# Altium PCB PCB_Dr5x3.PcbDoc
Units mm, origin at the board's own origin, x right, y up, seen from the top; angles counter-clockwise.
Board outline 75 x 45.98 mm, 2 copper layers (Top Layer, Bottom Layer), stack 1.601 mm thick; 37 components, 22 nets, 122 pads, 7 vias.
Unrouted connection lines stored in the file: 5.
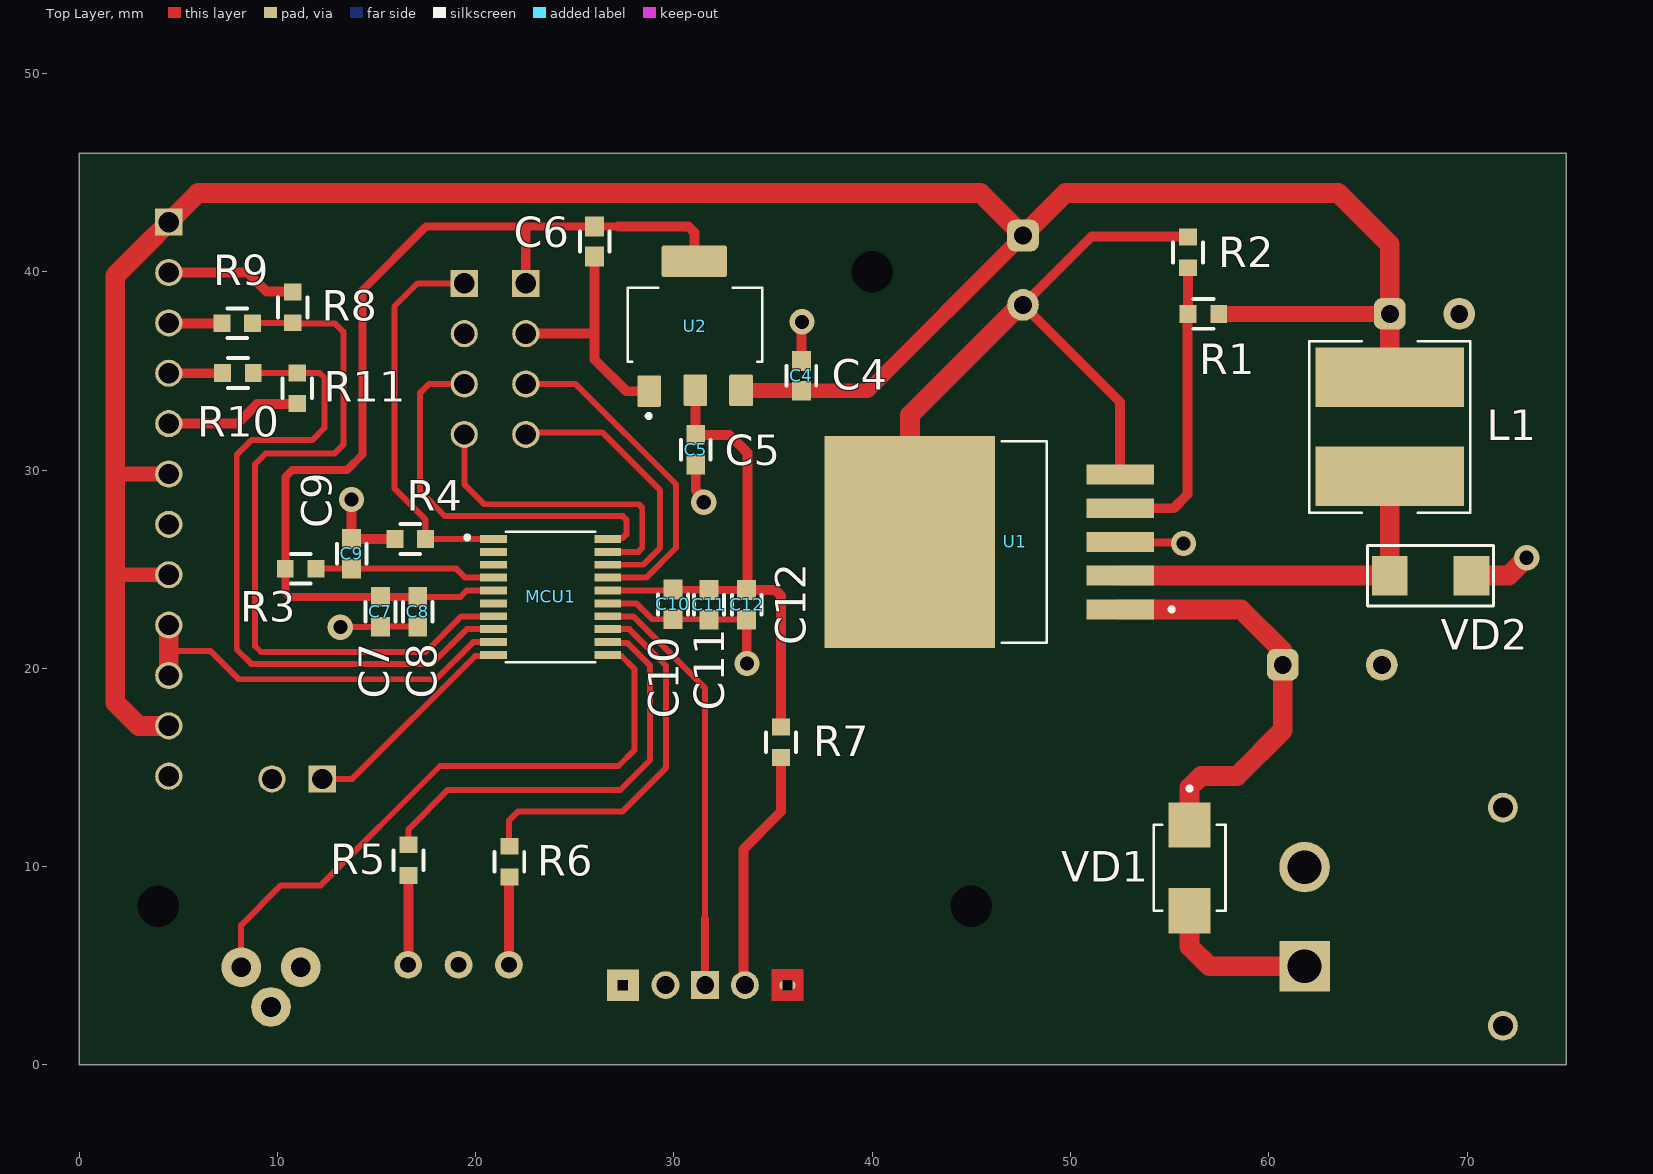
[diagram p0: Top Layer view]
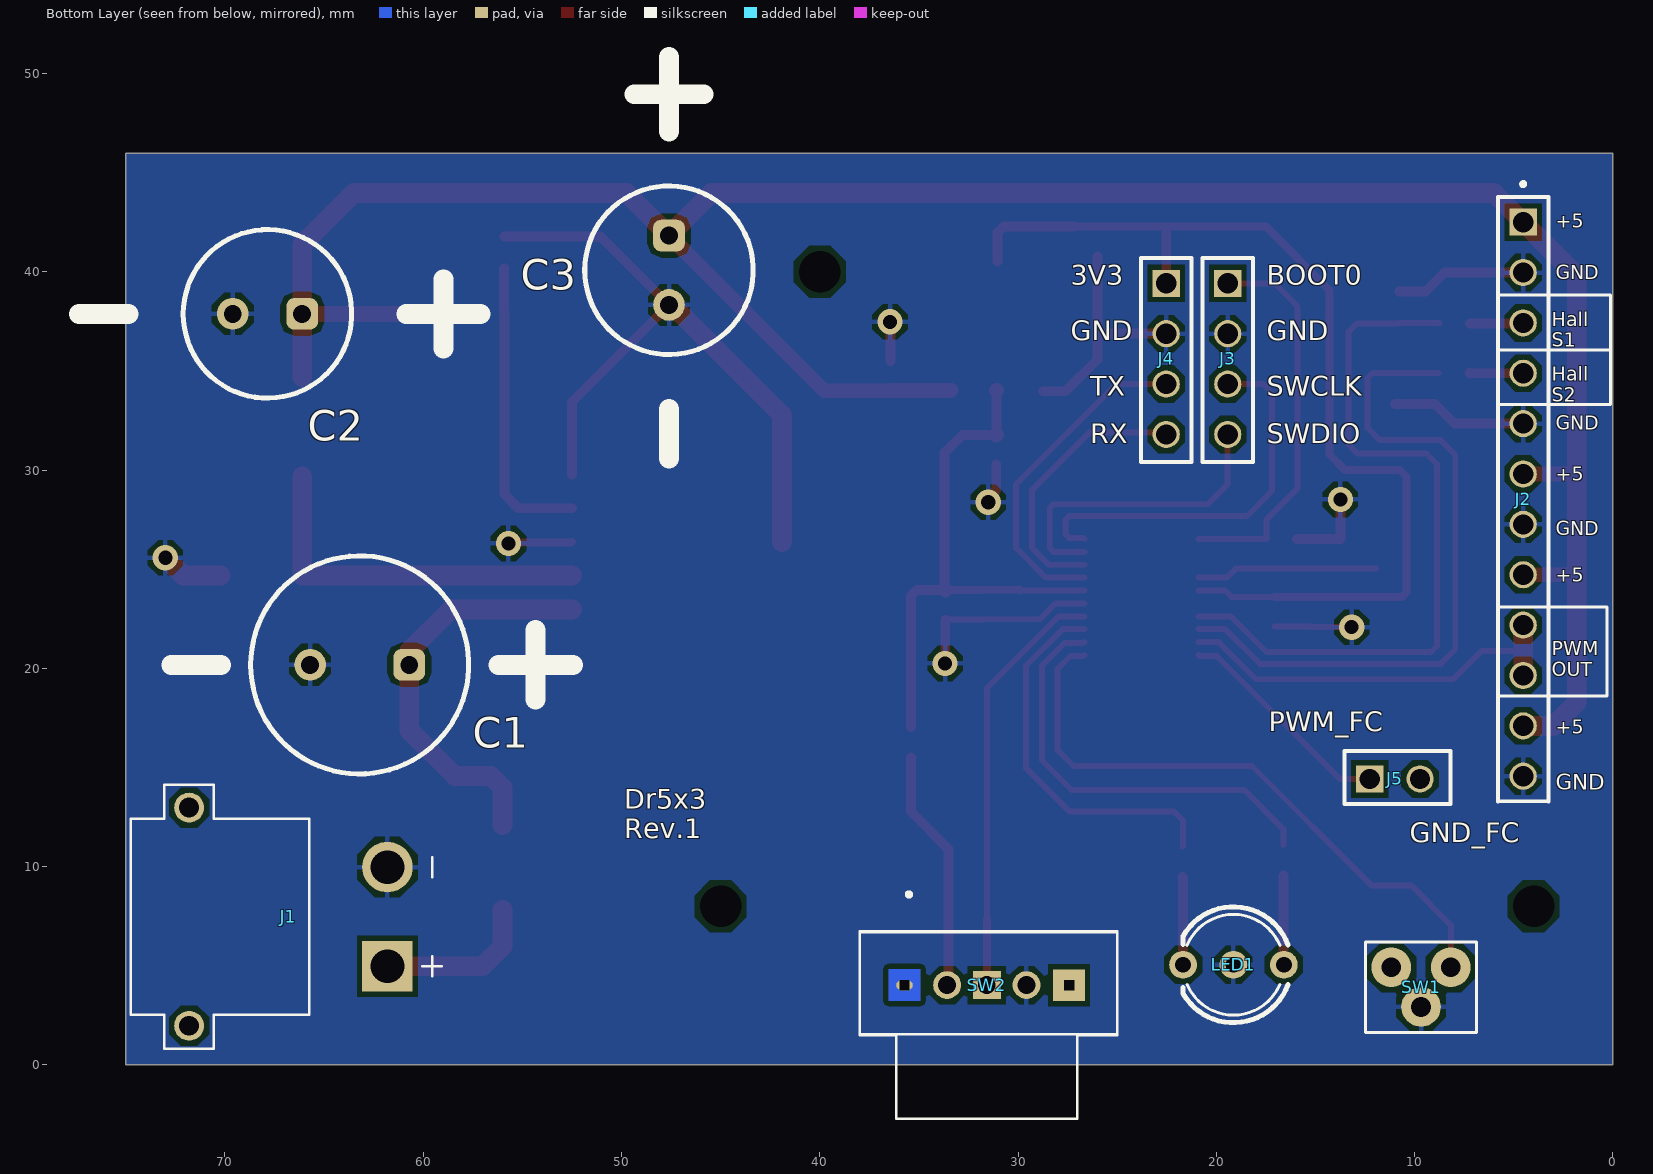
[diagram p1: Bottom Layer view, seen from below]
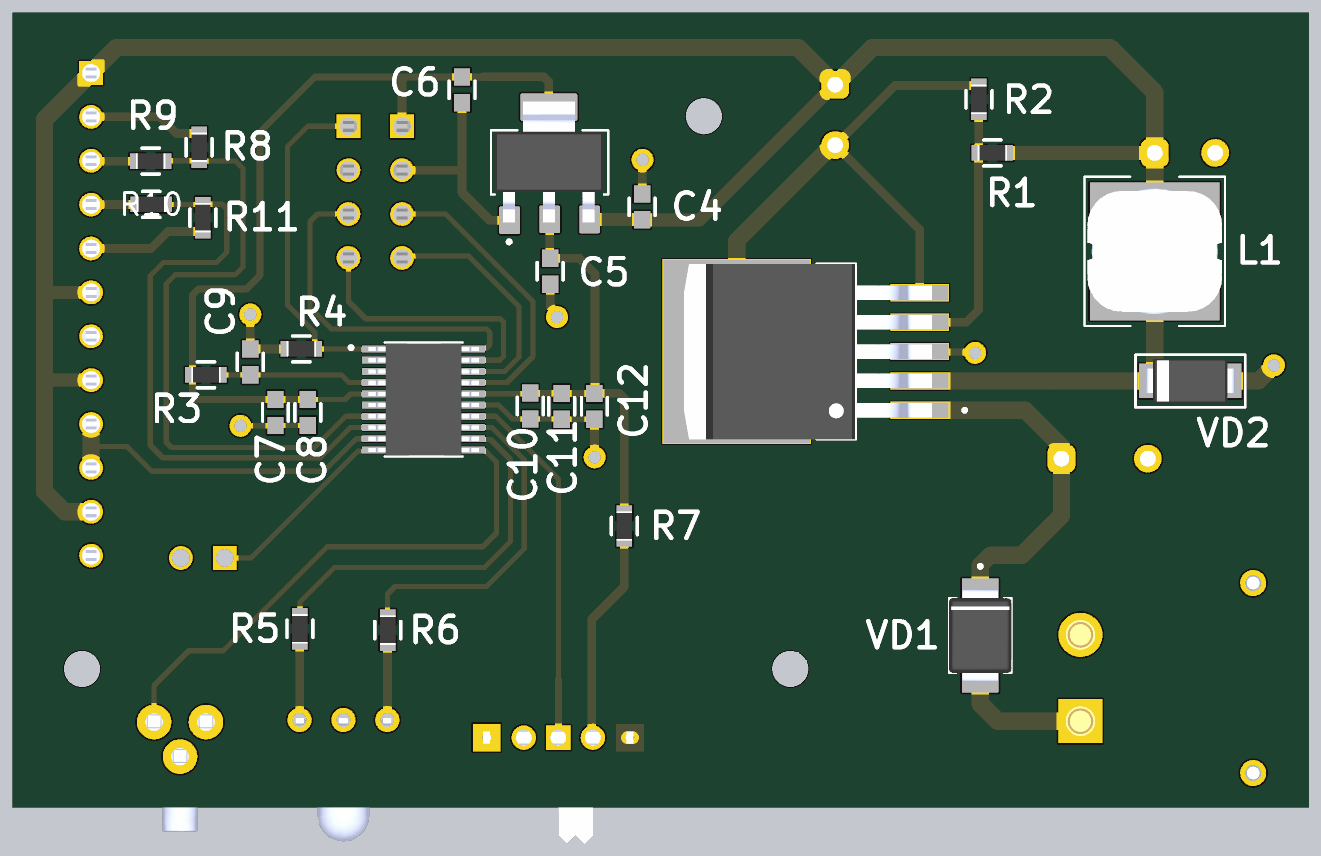
[diagram p2: 3D render of the assembled board from above, using the file's embedded part models]
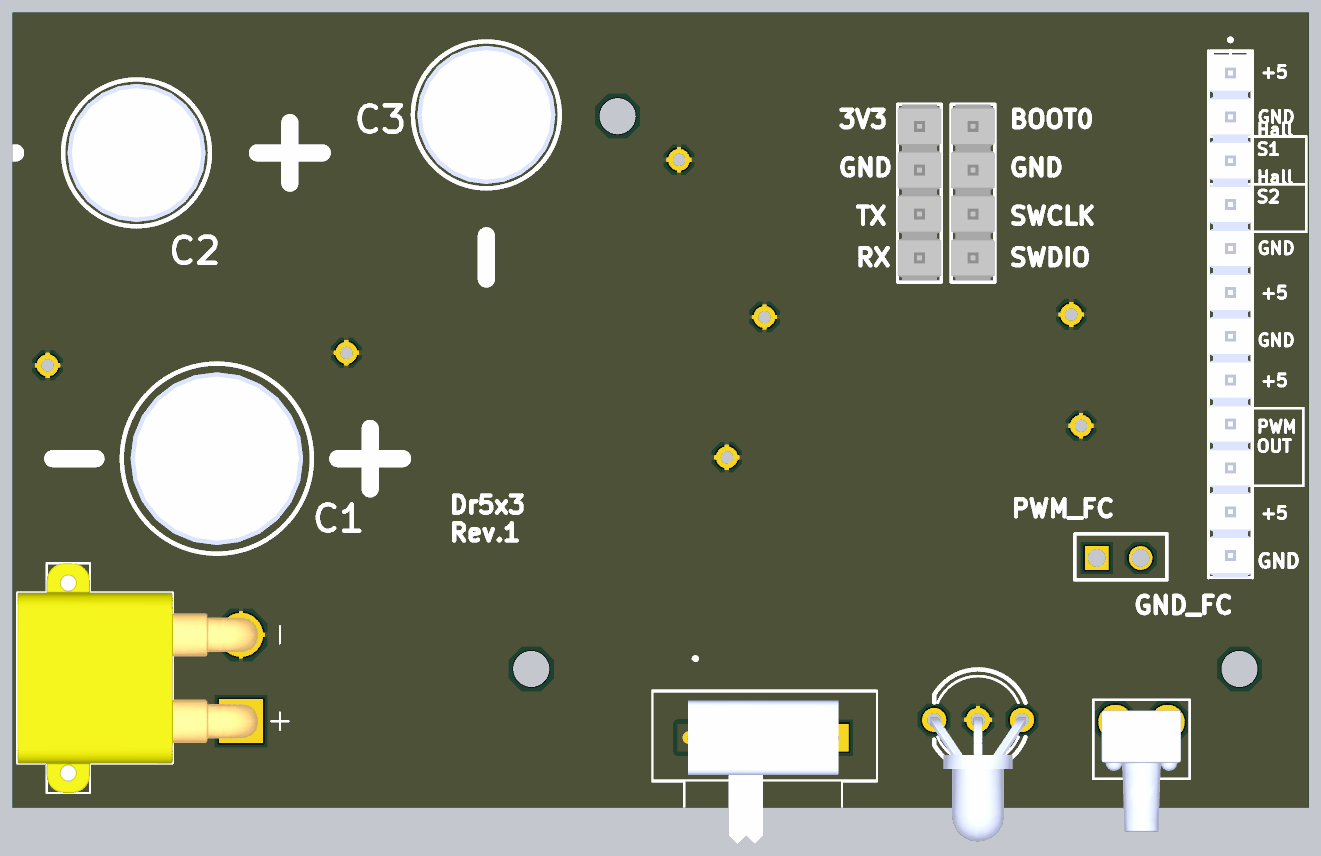
[diagram p3: 3D render of the assembled board from below, using the file's embedded part models]

## Layer stack, top to bottom
Top Solder: solder mask 0.012, Solder Resist, Dk 3.8
Top Layer: signal copper 0.0356
Dielectric 1: dielectric 1.53, FR-4, Dk 4.5
Bottom Layer: signal copper 0.0356
Bottom Solder: solder mask 0.012, Solder Resist, Dk 3.8

## Board outline
0,0 0,45.975 75,45.975 75,0

## Design rules (kind name [scope] priority, off if disabled: settings)
Clearance [All] p1: gap=0.254 ignorepadtopadclearanceinfootprint=TRUE
MinimumSolderMaskSliver [All] p1: minsoldermaskwidth=0.1
PolygonConnect [All] p1: connectstyle=Relief reliefconductorwidth=0.254 reliefentries=4 polygonreliefangle="90 Angle" airgapwidth=0.254
RoutingVias [All] p1: holewidth=1 width=1.6 viastyle="Through Hole" minholewidth=0.711 minwidth=1.27 maxholewidth=0.711 maxwidth=1.27
SilkToSilkClearance [All] p1: silktosilkclearance=0.1
SilkToSolderMaskClearance [IsPad] p1: minsilkscreentomaskgap=0.1 clearancetoexposedcopper=TRUE
SolderMaskExpansion [All] p1: expansion=0.102 istentingtop=FALSE
SupplyNets "Schematic Supply Nets_2" [InNet('GND')] p1: voltage=0.000
SupplyNets "Schematic Supply Nets_1" [InNet('3V3')] p2: voltage=0.000
SupplyNets "Schematic Supply Nets" [InNet('+5')] p3: voltage=0.000
Width [All] p1: maxlimit=1 minlimit=0.2 preferedwidth=0.4 minimp=50.000000 maximp=50.000000 favimp=50.000000
27 further rules are at their usual default settings.

## Classes and differential pairs
component class U_Power: C1 C2 C3 C4 C5 C6 J1 L1 R1 R2 U1 U2 VD1 VD2
component class U_MCU: C7 C8 C9 C10 C11 C12 LED1 MCU1 R3 R4 R5 R6 R7 SW1 SW2
component class U_i_O: J2 J4 J5 R8 R9 R10 R11

## Components (designator, comment, footprint, x,y, rotation, side; value= is the part's Value field where it differs from the comment)
C1 "100uF 63V" C_POL_D10_P5 63.2,20.175 r0 bottom
C2 "220uF 25V" C_POL_D8_P3.5 67.85,37.875 r0 bottom
C3 "1000uF 10V" C_POL_D8_P3.5 47.6,40.075 r270 bottom
C4 "10uF 6,3V" C_0603 36.425,34.75 r90 top
C5 "22uF 6.3V" C_0603 31.1,31.025 r90 top
C6 "22uF 6.3V" C_0603 26,41.525 r90 top
C7 "1nF" C_0603 15.2,22.85 r270 top
C8 "10nF" C_0603 17.075,22.85 r90 top
C9 "100nF" C_0603 13.745,25.775 r270 top
C10 "100nF" C_0603 29.95,23.225 r90 top
C11 "100nF" C_0603 31.765,23.202 r90 top
C12 "4,7uF" C_0603 33.665,23.202 r90 top
J1 "XT30 male" XT30PW-M 71.8,7.475 r90 bottom
J2 "Pin_12_Header" pin_h_12_p2,54mm 4.525,42.5 r270 bottom
J3 "Pin_4_Header" pin_h_4_p2,54mm 19.425,39.415 r270 bottom
J4 "Pin_4_Header" pin_h_4_p2,54mm 22.527,39.415 r270 bottom
J5 "2 pin header" pin_h_2_p2,54mm 12.265,14.425 r180 bottom (schematic designator J3)
L1 "33uH" L_SND0705 66.1,32.175 r90 top
LED1 "Led GB" led_5mm_3pin 19.135,5.05 r90 bottom
MCU1 "STM32F030F4P6" TSSOP-20 23.775,23.6 r0 top
R1 "3.01K" R0603 56.7,37.875 r180 top
R2 "1K" R0603 55.925,40.975 r90 top
R3 "10K" R0603 11.175,25.025 r0 top
R4 "10K" R0603 16.7,26.525 r0 top
R5 "51" R0603 16.616,10.325 r270 top
R6 "51" R0603 21.7,10.25 r270 top
R7 "10K" R0603 35.4,16.275 r90 top
R8 "20K" R0603 10.777,38.2 r270 top
R9 "10K" R0603 7.975,37.4 r180 top
R10 "10K" R0603 8.007,34.894 r180 top
R11 "20K" R0603 11,34.125 r90 top
SW1 "4,5x4,5, H7mm," button_SPST_NO 9.675,3.925 r180 bottom
SW2 "button_slide_switch_2" button_slide_switch_2 31.575,4.025 r180 bottom
U1 "LM2596SX-ADJ/NOPB TI" LM2596SX-ADJ/NOPB 41.9,26.375 r180 top
U2 "AMS1117-3.3" LDO_SOT223 31.1,37.325 r0 top
VD1 "RS2M" VD_DO-214AA 56,9.94 r270 top
VD2 "SS34A" D_SCH_SS34A 68.16,24.675 r180 top

## Footprints (in the part's own frame and the unit in brackets; to place one, negate y for a bottom-side part, rotate by r counter-clockwise, add the part's x,y. Pads: shape width x height; smd on the part's side, far side on the other; paste and mask are expansions set on the pad)
button_slide_switch_2 [mm]
  round 1.408 hole 0.9: 1(-2,0) 3(2,0)
  rect 1.408x1.408 / inner round 1.408 / far side rect 1.408x1.408 hole 0.9: 2(0,0)
  oval 0.825x0.525 hole 0.5 square unplated: N1(-4.15,0)
  rect 1.6x1.6 hole 0.5 square unplated: N2(4.15,0)
  Top Layer region: -4.95,-0.8 -3.35,-0.8 -3.35,0.8 -4.95,0.8
  Bottom Layer region: -4.95,-0.8 -3.35,-0.8 -3.35,0.8 -4.95,0.8
  silkscreen extent -6.41,-6.73 6.59,4.67, body extent -4.35,-6.15 4.35,2.15, height 3.5
button_SPST_NO [mm]
  round 2 hole 1: A(1.5,1) B(0,-1) GND(-1.5,1)
  silkscreen extent -2.79,-2.29 2.79,2.29, body extent -2.3,-5.33 2.3,1.67, height 4.6
C_0603 [mm] "C?"
  rect 1x0.95 smd: 1(-0.75,0) 2(0.75,0)
  silkscreen extent -0.5,-0.75 0.5,0.75, body extent -0.85,-0.45 0.85,0.45, height 0.9
C_POL_D8_P3.5 [mm]
  round 1.6 hole 0.9: N(1.75,0)
  rrect50% 1.6x1.6 hole 0.9 paste-2539.97: P(-1.75,0)
  silkscreen extent -10.75,-4.25 9.5,4.25, body extent -4,-4 4,4, height 11.5
C_POL_D10_P5 [mm]
  round 1.6 hole 0.9: N(2.5,0)
  rrect50% 1.6x1.6 hole 0.9 paste-2539.97: P(-2.5,0)
  silkscreen extent -10.75,-5.5 9.5,5.5, body extent -4.99,-5 4.99,5, height 13
D_SCH_SS34A [mm]
  rect 1.8x2 smd: A(-2.06,0) K(2.06,0)
  silkscreen extent -3.18,-1.52 3.18,1.52, body extent -2.57,-1.28 2.57,1.28, height 2.62
L_SND0705 [mm]
  rect 3x7.5 smd: 1(-2.5,0) 2(2.5,0)
  silkscreen extent -4.32,-4.06 4.32,4.06, body extent -3.65,-3.9 3.65,3.9, height 5
LDO_SOT223 [mm] "AMS1117-3.3"
  rrect15% 1.2x1.6 smd: 1(-2.35,-3.35) 2(-0.025,-3.3) 3(2.286,-3.302)
  rrect15% 3.3x1.6 smd: 4(-0.075,3.2)
  silkscreen extent -3.42,-4.7 3.36,1.86, body extent -3.22,-3.47 3.08,3.53, height 1.8
led_5mm_3pin [mm]
  round 1.4 hole 0.8 mask+0.102: 1(0,2.54) 2(0,0) 3(0,-2.54)
  silkscreen extent -2.92,-2.75 2.92,2.54, body extent -7.04,-2.79 0.13,2.79, height 7
LM2596SX-ADJ/NOPB [mm]
  rect 3.4x1 smd paste-0.05 mask+0.07: 1(-10.6,3.4) 2(-10.6,1.7) 3(-10.6,0) 4(-10.6,-1.7) 5(-10.6,-3.4)
  rect 8.6x10.7 smd paste-0.05 mask+0.07: 3(0,0)
  silkscreen extent -13.3,-5.08 -4.62,5.08, body extent -11.3,-5.08 3.05,5.08, height 4.65
pin_h_2_p2,54mm [mm]
  rect 1.37x1.37 hole 1.02: 1(0,0)
  round 1.37 hole 1.02: 2(2.54,0)
  silkscreen extent -1.27,-1.27 4.06,1.4
pin_h_4_p2,54mm [mm]
  rect 1.37x1.37 hole 1.02: 1(0,0)
  round 1.37 hole 1.02: 2(2.54,0) 3(5.08,0) 4(7.62,0)
  silkscreen extent -1.27,-1.27 9.02,1.27, body extent -1.27,-1.27 8.89,1.27, height 8.38
pin_h_12_p2,54mm [mm]
  rect 1.37x1.37 hole 1.02: 1(0,0)
  round 1.37 hole 1.02: 2(2.54,0) 3(5.08,0) 4(7.62,0) 5(10.16,0) 6(12.7,0) 7(15.24,0) 8(17.78,0) 9(20.32,0) 10(22.86,0) 11(25.4,0) 12(27.94,0)
  silkscreen extent -2.02,-1.27 29.21,1.27, body extent -1.4,-1.27 29.21,1.27, height 5.21
R0603 [mm]
  rect 0.85x0.9 smd: 1(-0.775,0) 2(0.775,0)
  silkscreen extent -0.5,-0.75 0.5,0.75, body extent -0.85,-0.45 0.85,0.45, height 0.55
TSSOP-20 [mm]
  rect 1.35x0.4 smd mask+0.05: 1(-2.88,2.925) 2(-2.88,2.275) 3(-2.88,1.625) 4(-2.88,0.975) 5(-2.88,0.325) 6(-2.88,-0.325) 7(-2.88,-0.975) 8(-2.88,-1.625) 9(-2.88,-2.275) 10(-2.88,-2.925) 11(2.88,-2.925) 12(2.88,-2.275) 13(2.88,-1.625) 14(2.88,-0.975) 15(2.88,-0.325) 16(2.88,0.325) 17(2.88,0.975) 18(2.88,1.625) 19(2.88,2.275) 20(2.88,2.925)
  silkscreen extent -4.3,-3.3 2.25,3.3, body extent -3.2,-3.25 3.2,3.25, height 1.16
VD_DO-214AA [mm]
  rect 2.28x2.12 smd: A(2.165,0) C(-2.165,0)
  silkscreen extent -4.1,-1.81 2.16,1.81, body extent -2.68,-1.81 2.68,1.81, height 2.65
XT30PW-M [mm]
  round 2.55 hole 1.7: N(2.5,-10)
  rect 2.55x2.55 / inner round 2.55 / far side rect 2.55x2.55 hole 1.7: P(-2.5,-10)
  round 1.508 hole 1: S1(5.5,0) S2(-5.5,0)
  silkscreen extent -6.65,-12.75 6.65,2.95, body extent -6.65,-11 6.65,2.95, height 5

## Part data
C1: library part "100uF 63V EHR 10x13mm", "100uF 63V EHR 10x13mm (EHR101M63B-Hitano)  Electrolytic", Capacitance=100uF, MPN=EHR101M63B-Hitano, Package="RADIAL-2 Panasonic", Supplier Part Number 1=50458, Voltage=63V, Availability="In Stock", Category=Electrolytic, Check_prices=https://www.snapeda.com/parts/EEUFR1J101LB/Panasonic/view-part/?ref=eda, Component Link 1 Description=Datasheet, Component Link 1 URL=https://www.rcscomponents.kiev.ua/datasheets/EHR_081225.pdf, MF=Hitano, MP=EEUFR1J101LB, Part Number="100uF 63V EHR 10x13mm", Price=None, SnapEDA_Link=https://www.snapeda.com/parts/EEUFR1J101LB/Panasonic/view-part/?ref=snap, Supplier 1=rcscomponents, Supplier Link 1=https://www.rcscomponents.kiev.ua/product/100uf-63v-ehr-10x13mm-ehr101m63b-hitano-elektrolitychnyi-kondensator_50458.html
C2: library part "220uF 25V RTE 8x11,5mm (low esr)", "220uF 25V RTE 8x11,5mm (low esr) (RTE1E221M0812-LEAGUER) Electrolytic", Capacitance=220uF, MPN=RTE1E221M0812-LEAGUER, Package="RADIAL-2 Panasonic", Supplier Part Number 1=180534, Voltage=25V, Availability="In Stock", Category=Electrolytic, Check_prices=https://www.snapeda.com/parts/EEUFR1J101LB/Panasonic/view-part/?ref=eda, Component Link 1 Description=Datasheet, Component Link 1 URL=https://www.rcscomponents.kiev.ua/datasheets/leaguer-rte_series-datasheet.pdf, ESR=low, MF=LEAGUER, MP=EEUFR1J101LB, Part Number="220uF 25V RTE 8x11,5mm (low esr)", Price=None, SnapEDA_Link=https://www.snapeda.com/parts/EEUFR1J101LB/Panasonic/view-part/?ref=snap, Supplier 1=rcscomponents, Supplier Link 1=https://www.rcscomponents.kiev.ua/product/220uf-25v-rte-8x11-5mm-low-esr-rte1e221m0812-leaguer-elektrolitychnyi-kondensator-nyzkoimpedansnyi_180534.html
C3: library part "1000uF 10V RT1 8x12mm", "1000uF 10V RT1 8x12mm +105°С", Capacitance=1000uF, Dielectric=electrolit, MPN=RT11A102M0812, Package="RADIAL-2 Panasonic", Supplier Part Number 1=124893, Voltage=10V, Availability="In Stock", Category="Pol electrolit", Check_prices=https://www.snapeda.com/parts/EEUFR1J101LB/Panasonic/view-part/?ref=eda, Component Link 1 Description=Datasheet, Component Link 1 URL=https://www.rcscomponents.kiev.ua/datasheets/ke47003518x36t-datasheet.pdf, MF=Leaguer, MP=EEUFR1J101LB, Part Number="1000uF 10V RT1 8x12mm", Price=None, SnapEDA_Link=https://www.snapeda.com/parts/EEUFR1J101LB/Panasonic/view-part/?ref=snap, Supplier 1=rcscomponents, Supplier Link 1=https://www.rcscomponents.kiev.ua/product/1000uf-10v-rt1-8x12mm-rt11a102m0812-leaguer-elektrolitychnyi-kondensator_124893.html
C4: library part "10uF 6,3V X5R 20% 0603", "10uF 6,3V X5R 20% 0603", Capacitance=10uF, Dielectric=X5R, MPN=C0603X106M063NT, Supplier Part Number 1=50744, Tolerance=0.2, Voltage=6.3V, Category="Ceramic Capacitor", Component Link 1 Description=Datasheet, Component Link 1 URL=https://www.rcscomponents.kiev.ua/datasheets/X7R_X5R.pdf, MF=Hitano, Part Number="10uF 6,3V X5R 20% 0603", Supplier 1=rcscomponents, Supplier Link 1=https://www.rcscomponents.kiev.ua/product/10uf-6-3v-x5r-20-0603-4k-reel-c0603x106m063nt-hitano-kondensator-keramichnyi-smd_50744.html
C5 C6: library part "22uF 6,3V X5R 20% 0603", "22uF 6,3V X5R 20% 0603", Capacitance=22uF, Dielectric=X5R, MPN=CL10A226MQ8NRNC, Supplier Part Number 1=128028, Tolerance=0.2, Voltage=6.3V, Category="Ceramic Capacitor", Component Link 1 Description=Datasheet, Component Link 1 URL=https://www.rcscomponents.kiev.ua/datasheets/cl_series_mlcc_datasheet.pdf, MF=Samsung, Part Number="22uF 6,3V X5R 20% 0603", Supplier 1=rcscomponents, Supplier Link 1=https://www.rcscomponents.kiev.ua/product/22uf-6-3v-x5r-20-0603-cl10a226mq8nrnc-samsung_128028.html
C7: library part "1nF 50V X7R 5% 0603", "1nF 50V X7R 5% 0603 4k/reel (C0603B102J500NT-Hitano)", Dielectric=X7R, MPN=C0603B102J500NT, Supplier Part Number 1=3303, Tolerance=0.05, Voltage=50V, Capacitance=1nF, Category="Ceramic Capacitor", Component Link 1 Description=Datasheet, Component Link 1 URL=https://www.rcscomponents.kiev.ua/datasheets/X7R_X5R.pdf, MF=Hitano, Part Number="1nF 50V X7R 5% 0603", Supplier 1=rcscomponents, Supplier Link 1=https://www.rcscomponents.kiev.ua/product/1nf-50v-x7r-5-0603-4k-reel-c0603b102j500nt-hitano-kondensator-keramichnyi-smd_3303.html
C8: library part "10nF 50V X7R 10% 0603", "10nF 50V X7R 10% 0603 (CL10B103KB8NNNC-Samsung)", Dielectric=X7R, MPN=CL10B103KB8NNNC, Supplier Part Number 1=34908, Tolerance=0.1, Voltage=50V, Capacitance=10nF, Category="Ceramic Capacitor", Component Link 1 Description=Datasheet, Component Link 1 URL=https://www.rcscomponents.kiev.ua/datasheets/cl_series_mlcc_datasheet.pdf, MF=Samsung, Part Number="10nF 50V X7R 10% 0603", Supplier 1=rcscomponents, Supplier Link 1=https://www.rcscomponents.kiev.ua/product/10nf-50v-x7r-10-0603-cl10b103kb8nnnc-samsung-kondensator-keramichnyi-smd_34908.html
C9 C10 C11: library part "100nF 16V X7R 5% 0603", "100nF 16V X7R 5% 0603 (CL10B104JO8NNNC – Samsung)", Dielectric=X7R, MPN=CL10B104JO8NNNC, Supplier Part Number 1=153351, Tolerance=0.05, Voltage=16V, Capacitance=100nF, Category="Ceramic Capacitor", Component Link 1 Description=Datasheet, Component Link 1 URL=https://www.rcscomponents.kiev.ua/datasheets/cl_series_mlcc_datasheet.pdf, MF=Samsung, Part Number="100nF 16V X7R 5% 0603", Supplier 1=rcscomponents, Supplier Link 1=https://www.rcscomponents.kiev.ua/product/100nf-16v-x7r-5-0603-cl10b104jo8nnnc-samsung_153351.html
C12: library part "4,7uF 6,3V X5R 10% 0603", "4,7uF 6,3V X5R 10% 0603 (CL10A475KQ8NNNC-Samsung)", Dielectric=X5R, MPN=CL10A475KQ8NNNC, Supplier Part Number 1=50674, Tolerance=0.1, Voltage=6.3V, Capacitance=4,7uF, Category="Ceramic Capacitor", Component Link 1 Description=Datasheet, Component Link 1 URL=https://www.rcscomponents.kiev.ua/datasheets/cl_series_mlcc_datasheet.pdf, MF=Samsung, Part Number="4,7uF 6,3V X5R 10% 0603", Supplier 1=rcscomponents, Supplier Link 1=https://www.rcscomponents.kiev.ua/product/4-7uf-6-3v-x5r-10-0603-cl10a475kq8nnnc-samsung_50674.html
J1: library part XT30PW-M, "Socket; DC supply; XT30; male; PIN: 2; on PCBs; THT; Colour: yellow", Package=None, Supplier Part Number 1=395565, Check_prices=https://www.snapeda.com/parts/XT30PW-M/AMASS/view-part/?ref=eda, MF=AMASS, MP=XT30PW-M, MPN=XT30PW-M, Part Number=XT30PW-M, SnapEDA_Link=https://www.snapeda.com/parts/XT30PW-M/AMASS/view-part/?ref=snap, Supplier 1=IMRAD, Supplier Link 1=https://imrad.com.ua/ru/xt30pw-m
J5: "p.2,54mm", Supplier Part Number 1=SKV114, MPN="2 pin header", Part Number="2 pin header", Supplier 1="Arduino UA", Supplier Link 1=https://arduino.ua/ru/prod332-konnektor-40-pin-papa
L1: library part "33uH, ±20%, 1.2A, 0.13 Ohm", "SND0705-330M (33uH, ±20%, 1.2A, 0.13 Ohm, SMD: 7.8x7.0mm, h=5.0mm) Anla Tech", Current=1.2A, Inductance="33 µH", MPN=SND0705-330M, Package=None, Supplier Part Number 1=39225, Tolerance=±20%, Availability="In Stock", Category="Power Inductor", Check_prices=https://www.snapeda.com/parts/B82472P6472M000/TDK/view-part/?ref=eda, Component Link 1 Description=Datasheet, Component Link 1 URL=https://www.rcscomponents.kiev.ua/datasheets/SND-1.pdf, DCR="0.13 Ω", MF=AnlaTech/IH, MP=B82472P6472M000, Part Number="33uH, ±20%, 1.2A, 0.13 Ohm", Price=None, Purchase-URL=https://pricing.snapeda.com/search/part/B82472P6472M000/?ref=eda, SnapEDA_Link=https://www.snapeda.com/parts/B82472P6472M000/TDK/view-part/?ref=snap, Supplier 1=rcscomponents, Supplier Link 1=https://www.rcscomponents.kiev.ua/product/snd0705-330m-33uh-20-1-2a-0-13-ohm-smd-7-8x7-0mm-h-5-0mm-anla-tech-drosel-sylovyi_39225.html
LED1: library part NPN328, "Led 5mm Green Blue СС", Package="Radial Vishay", Availability=Unavailable, Category=Led, IF=0.020A, MF=Vishay, MP=TLUV5300, MPN=NPN328, Part Number=NPN328, Price=None, SnapEDA_Link=https://www.snapeda.com/parts/TLUV5300/Vishay%20Semiconductor%20Opto%20Division/view-part/233523/?ref=snap, Supplier 1=Arduino.ua, Supplier Link 1=https://arduino.ua/ru/prod6409-svitlodiod-dvokolirnii-prozorii-3mm-katod-sinii-zelenii, Supplier Part Number 1=NPN328, VRRM=3-3.2V
MCU1: library part TSSOP-20, "MCU", CPU Frequency="48 MHz", Operating Voltage="2.4–3.6 V", Supplier Part Number 1=68666, ADC=12-bit, Check_prices=https://www.snapeda.com/parts/STM32F030F4P6/STMicroelectronics/view-part/?ref=eda, Component Link 1 Description=Datasheet, Component Link 1 URL=https://www.rcscomponents.kiev.ua/datasheets/dm00088500-datasheet.pdf, Core="ARM Cortex-M0", Flash="16 KB", GPIO=15, MF=STMicroelectronics, MP=STM32F030F4P6, MPN=STM32F030F4P6, Package=TSSOP-20, Part Number=TSSOP-20, RAM="4 KB", SnapEDA_Link=https://www.snapeda.com/parts/STM32F030F4P6/STMicroelectronics/view-part/?ref=snap, Supplier 1=rcscomponents, Supplier Link 1=https://www.rcscomponents.kiev.ua/product/stm32f030f4p6_68666.html
R1: library part "R0603 3.01K 1% 0.1W", "R0603 3.01K 1% 0.1W Hitano", MPN=RC0603FR-3K01R, Power=0.1W, Supplier Part Number 1=27651, Tolerance=0.01, Voltage=50V, Category="Thick Film Resistor", Component Link 1 Description=Datasheet, Component Link 1 URL=https://www.rcscomponents.kiev.ua/datasheets/RC0603HIT.pdf, MF=Hitano, Part Number="R0603 3.01K 1% 0.1W", Resistance=3.01K, Supplier 1=rcscomponents, Supplier Link 1=https://www.rcscomponents.kiev.ua/product/3-01-kohm-1-0-1w-50v-0603-rc0603fr-3k01r-hitano-rezystor-smd_27651.html, TCR="±100 ppm/°C"
R2: library part "R0603 1K 1% 0.1W", "R0603 1K 1% 0.1W YAGEO", MPN=RC0603FR-071KL, Power=1/10W, Resistance=1k, Supplier Part Number 1=182684, Tolerance=0.01, Voltage=75V, Category="Thick Film Resistor", Component Link 1 Description=Datasheet, Component Link 1 URL=https://www.rcscomponents.kiev.ua/datasheets/rc0603-272842.pdf, MF=YAGEO, Part Number="R0603 1K 1% 0.1W", Supplier 1=rcscomponents, Supplier Link 1=https://www.rcscomponents.kiev.ua/product/1-kohm-1-0-1w-75v-0603-rc0603fr-071kl-yageo-rezystor-smd_182684.html, TCR="±100 ppm/°C"
R3 R4 R7 R9 R10: library part "R0603 10K 5% 0.1W", "10 kOhm 5% 0,1W 50V", MPN=RC0603JR-0710KL, Power=0.1W, Supplier Part Number 1=107096, Tolerance=0.05, Voltage=50V, Category="Thick Film Resistor", Component Link 1 Description=Datasheet, MF=Yageo, Part Number="R0603 10K 5% 0.1W", Resistance=10K, Supplier 1=rcscomponents, Supplier Link 1=https://www.rcscomponents.kiev.ua/product/10-kohm-5-0-1w-50v-0603-rc0603jr-0710kl-yageo_107096.html
R5 R6: library part "51 Ohm 5% 0,1W 50V 0603", "51 Ohm 5% 0,1W 50V 0603", MPN=RC0603JR-51R, Power=0.1W, Resistance="51 Ohm", Supplier Part Number 1=4627, Tolerance=0.05, Voltage=50V, Category="Thick Film Resistor", Component Link 1 Description=Datasheet, Component Link 1 URL=https://www.rcscomponents.kiev.ua/datasheets/rc_series_hitano-datasheet.pdf, MF=Hitano, Part Number="51 Ohm 5% 0,1W 50V 0603", Supplier 1=rcscomponents, Supplier Link 1=https://www.rcscomponents.kiev.ua/product/51-ohm-5-0-1w-50v-0603-rc0603jr-51r-hitano-rezystor-smd_4627.html
R8 R11: library part "R0603 20 kOhm 1% 0,1W 50V", "20 kOhm 1% 0,1W 50V", MPN=RC0603FR-20KR, Power=0.1W, Supplier Part Number 1=16748, Tolerance=0.01, Voltage=50V, Category="Thick Film Resistor", Component Link 1 Description=Datasheet, Component Link 1 URL=https://www.rcscomponents.kiev.ua/datasheets/rc_series_hitano-datasheet.pdf, MF=Hitano, Part Number="R0603 20 kOhm 1% 0,1W 50V", Resistance=20K, Supplier 1=rcscomponents, Supplier Link 1=https://www.rcscomponents.kiev.ua/product/20-kohm-1-0-1w-50v-0603-rc0603fr-20kr-hitano-rezystor-smd_16748.html
SW1: library part SPST-NO, MPN=KFC-045P3-7.0, Param 1 (Value)=0,98N., Param 2 (Power)="4,5x4,5, H7mm", Param 3 (Tolerance)=12VDC/50mA, Supplier Part Number 1=209769, MF=Daier, Param 4 (Category)="Tact button corner THT", Part Number=SPST-NO, Supplier 1=rcscomponents., Supplier Link 1=https://www.rcscomponents.kiev.ua/product/knopka-taktova-kutova-4-5x4-5-h7mm-kfc-045p3-7-0_209769.html
SW2: "8x6,9x4,3", MPN="SK-12D11-VG3 KLS", Package=None, Supplier Part Number 1=148265, Check_prices=https://www.snapeda.com/parts/STS121RA04/TE+Connectivity+ALCOSWITCH+Switches/view-part/?ref=eda, Component Link 1 Description=Datasheet, Component Link 1 URL=https://www.rcscomponents.kiev.ua/datasheets/sk-12d11-vg3.pdf, MF="TE Connectivity", MP=STS121RA04, Part Number=button_slide_switch_2, SnapEDA_Link=https://www.snapeda.com/parts/STS121RA04/TE+Connectivity+ALCOSWITCH+Switches/view-part/?ref=snap, Supplier 1=rcscomponents148265, Supplier Link 1=https://www.rcscomponents.kiev.ua/product/peremykach-rushiinyi-sk-12d11-vg3_148265.html
U1: library part LM2596SX-ADJ/NOPB, "DC/DC Buck Converter IC", Frequency="150 kHz", Package="TO-263-5 Texas Instruments", Supplier Part Number 1=61180, Category="Buck Converter (SMD)", Check_prices=https://www.snapeda.com/parts/LM2596SX-ADJ/NOPB/Texas+Instruments/view-part/?ref=eda, Component Link 1 Description=Datasheet, Component Link 1 URL=https://www.ti.com/general/docs/suppproductinfo.tsp?distId=10&gotoUrl=http%3A%2F%2Fwww.ti.com%2Flit%2Fgpn%2Flm2596, IOUT=3A, MF="Texas Instruments", MP=LM2596SX-ADJ/NOPB, MPN=LM2596SX-ADJ/NOPB, Part Number=LM2596SX-ADJ/NOPB, SnapEDA_Link=https://www.snapeda.com/parts/LM2596SX-ADJ/NOPB/Texas+Instruments/view-part/?ref=snap, Supplier 1=rcscomponents, Supplier Link 1=https://www.rcscomponents.kiev.ua/product/lm2596sx-adj-nopb_61180.html, Type=Adjustable, VIN=4.5–40V, VOUT="1.23–37 V, Adjustable"
U2: library part LDO_SOT223_3V3, "Linear Voltage Regulator IC Positive Fixed 1 Output 1A SOT-223-3L", Package="SOT-223-3L UMW", Supplier Part Number 1=87031, Category="LDO Regulator (SMD)", Check_prices=https://www.snapeda.com/parts/AMS1117-3.3/UMW/view-part/?ref=eda, Component Link 1 Description=Datasheet, Component Link 1 URL=https://mm.digikey.com/Volume0/opasdata/d220001/medias/docus/7158/5272_AMS1117-3.3.pdf, Dropout=1.1V, IOUT=1A, MF=Multiple, MP=AMS1117-3.3, MPN=AMS1117-3.3, Output Type=Fixed, Part Number=LDO_SOT223_3V3, SnapEDA_Link=https://www.snapeda.com/parts/AMS1117-3.3/UMW/view-part/?ref=snap, Supplier 1=rcscomponents, Supplier Link 1=https://www.rcscomponents.kiev.ua/product/ams1117-3-3_87031.html, VIN (Max)=15V, VOUT=3.3V
VD1: library part "RS2M MIC", "Vf 1.3 / I2A / 1000V", Package="DO-214AA-2 Taiwan Semiconductor", Supplier Part Number 1=182600, Availability="In Stock", Category=Diode, Check_prices=https://www.snapeda.com/parts/RS2M/Taiwan+Semiconductor/view-part/?ref=eda, Component Link 1 Description=Datasheet, Component Link 1 URL=https://www.rcscomponents.kiev.ua/product/rs2m_182600.html, IF=2A, MF=MIC, MP=RS2M, MPN="RS2M MIC", Part Number="RS2M MIC", Price=None, SnapEDA_Link=https://www.snapeda.com/parts/RS2M/Taiwan+Semiconductor/view-part/?ref=snap, Supplier 1=rcscomponents, Supplier Link 1=https://www.rcscomponents.kiev.ua/product/rs2m_182600.html, VF=1.3V, VRRM=1000V
VD2: "Vrrm 40V / If 3А / Vf0,5V / Ifsm80A", Supplier Part Number 1=199953, Category="Schottky Diode", Component Link 1 Description=Datasheet, Component Link 1 URL=https://www.rcscomponents.kiev.ua/datasheets/2204281430_Guangdong-Hottech-SS34A_C2886580.pdf, IF=3A, IFSM=80A, MF=Hottech, MPN=SS34A, Part Number=SS34A, Supplier 1=rcscomponents, Supplier Link 1=https://www.rcscomponents.kiev.ua/product/ss34a_199953.html, VF=0.5V, VRRM=40V

## Free pads (board coordinates)
  round 2 hole 2.1 unplated: ""(4,8) ""(40,40) ""(45,8)

## Via types
v1: diameter 1.27, hole 0.711, Top Layer to Bottom Layer, 7 vias

## Nets (pads, with @x,y where several pads share a name; then routed paths per layer and width w, separated by ;. In a path a pad name is that pad's centre, name@x,y a point inside that pad or via, vN(x,y) a via of type N, cw(c..) or ccw(c..) an arc to the next point about the centre after c; other vN are vias at no path point)
3V3: C5.2 C6.2 C7.1 C8.2 C10.2 C11.2 C12.2 J4.1 MCU1.5 MCU1.16 R3.1 R7.2 U2.2 U2.4 | length 79.2
  Top Layer w0.3: C8.2 19.225,23.6 19.55,23.925 MCU1.5 ; MCU1.16@26.655,23.93 C10.2@29.905,23.93
  Top Layer w0.4: C8.2 C7.1 10.634,23.6 10.4,23.834 R3.1 10.4,29.65 10.75,30 13.51,30 14.3,30.79 14.3,39.075 17.5,42.275 22.375,42.275 C6.2 27.2,42.275 ; C10.2@29.905,23.93 C10.2 29.961,23.964 31.754,23.964 C11.2 C12.2
  Top Layer w0.5: J4.1 22.527,42.137 ; 27.2,42.275 30.725,42.275 31.025,41.975 U2.4 ; C5.2@31.087,31.788 U2.2@31.087,34.012 ; C5.2 32.8,31.775 33.7,30.875 C12.2@33.7,23.987 ; C12.2 35.107,23.952 35.4,23.659 R7.2
  Top Layer w0.75: U2.2 U2.2@31.087,34.012 ; C5.2@31.087,31.788 C5.2 ; C12.2 C12.2@33.7,23.987
+5: C2.P C3.P C4.1 J2.1 J2.6 J2.8 J2.11 L1.2 R1.1 U2.3 | length 131.7
  Top Layer w0.75: 1.825,24.72 J2.8 ; 1.825,29.8 J2.6 ; U2.3 33.397,34.011 36.414,34.011 C4.1 39.775,34 C3.P
  Top Layer w0.8: R1.1@57.552,37.875 C2.P
  Top Layer w1: J2.11 3.005,17.1 1.825,18.28 1.825,24.72 1.825,29.8 1.825,39.8 6,43.975 45.45,43.975 C3.P 49.75,43.975 63.5,43.975 66.1,41.375 C2.P L1.2
BOOT0: J3.1 MCU1.1 R4.2 | length 19.8
  Top Layer w0.3: J3.1 17.065,39.415 15.9,38.25 15.9,29.075 17.475,27.5 R4.2 MCU1.1
FB: R1.2 R2.1 U1.4 | length 15.1
  Top Layer w0.5: U1.4 55.2,28.075 55.9,28.775 55.9,37.973 55.902,37.975 55.913,37.987 55.913,40.165 R2.1@55.902,40.177
GND: C1.N C2.N C3.N C4.2 C5.1 C6.1 C7.2 C8.1 C9.1 C10.1 C11.1 C12.1 J1.N J2.2 J2.5 J2.7 J2.12 J3.2 J4.2 LED1.2 MCU1.15 R2.2 R4.1 R8.1 R11.1 SW1.B SW2.3 U1.3 U1.5 U2.1 VD2.A | length 88.6
  Top Layer w0.3: v1(13.175,22.075) 15.175,22.075 C7.2 C8.1 ; MCU1.15 28.1,23.275 28.9,22.475 C10.1 31.742,22.475 C11.1 ; C11.1@31.765,22.427 C11.1 ; C12.1 C11.1
  Top Layer w0.4: U1.3@52.5,26.375 52.537,26.338 55.662,26.338 v1(55.7,26.3)
  Top Layer w0.5: J2.5 7.985,32.34 8.972,33.328 R11.1@11,33.328 ; J2.2 8.485,39.96 8.487,39.963 9.45,39 R8.1@10.775,39 ; v1(13.745,28.52) v1@13.745,28.465 ; v1@13.8,28.575 13.8,28.52 v1@13.745,28.465 ; R4.1 C9.1 v1@13.745,28.465 ; J4.2 26,36.875 ; C6.1 26,35.575 27.6,33.975 U2.1 ; C5.1 31.1,28.983 31.5,28.583 v1(31.5,28.375) ; C12.1 33.67,22.447 33.67,20.255 v1(33.675,20.25) ; C4.2 36.438,35.512 36.438,37.463 v1(36.45,37.475) ; U1.5 52.5,33.425 C3.N 51.05,41.775 R2.2@55.9,41.775
  Top Layer w1: U1.3@41.9,26.375 41.9,32.775 47.45,38.325 C3.N ; VD2.A 72.1,24.675 v1(73,25.575)
Hall_S1: J2.3 MCU1.7 R8.2 R9.1 R9.2 | length 40.1
  Top Layer w0.3: R9.1 8.775,37.425 R8.2 10.802,37.4 12.9,37.4 13.325,36.975 13.325,31.275 12.875,30.825 9.4,30.825 8.875,30.3 8.875,21.125 9.175,20.825 17.475,20.825 19.275,22.625 MCU1.7
  Top Layer w0.5: J2.3@4.525,37.4 R9.2
Hall_S2: J2.4 MCU1.8 R10.1 R10.2 R11.2 | length 37.7
  Top Layer w0.3: R10.1 R11.2@10.994,34.894 ; R11.2 12.125,34.9 12.375,34.65 12.375,32.125 11.775,31.525 8.7,31.525 7.95,30.775 7.95,20.95 8.675,20.225 17.8,20.225 19.55,21.975 MCU1.8
  Top Layer w0.5: J2.4 R10.2
Led1: MCU1.13 R6.1 | length 19.2
  Top Layer w0.3: R6.1 21.687,11.038 21.687,12.337 22.125,12.775 27.4,12.775 29.61,14.985 ; MCU1.13 27.75,21.975 29.6,20.125 29.6,14.985
Led2: MCU1.12 R5.1 | length 21.8
  Top Layer w0.3: R5.1 16.616,11.891 18.6,13.875 27.3,13.875 28.8,15.375 28.8,20.125 27.638,21.287 26.693,21.287 MCU1.12
NetLED1_1: LED1.1 R6.2 | length 4.4
  Top Layer w0.5: LED1.1 21.688,5.062 21.688,9.463 R6.2
NetLED1_3: LED1.3 R5.2 | length 4.5
  Top Layer w0.5: LED1.3 16.606,5.061 16.606,9.54 R5.2
NRST: C9.2 MCU1.4 R3.2 | length 9.1
  Top Layer w0.3: R3.2 C9.2 19.025,25.025 19.475,24.575 MCU1.4
PWM_FC: J5.1 MCU1.10 | length 11.2
  Top Layer w0.3: J5.1 13.775,14.425 19.97,20.62 20.84,20.62 MCU1.10
PWM_Servo: J2.9 J2.10 MCU1.9 | length 20.3
  Top Layer w0.3: 4.525,20.87 6.6,20.87 ; 6.615,20.885 8.05,19.45 18.002,19.45 19.875,21.324 20.894,21.324 MCU1.9
  Top Layer w1: J2.10 4.525,20.87 J2.9
SW: L1.1 U1.2 VD2.K | length 18.6
  Top Layer w1: U1.2 VD2.K L1.1
SW1: MCU1.11 SW1.A | length 31.3
  Top Layer w0.3: SW1.A 8.175,7.05 10.178,9.053 12.178,9.053 18.2,15.075 27.2,15.075 28,15.875 28,19.975 27.355,20.62 26.71,20.62 MCU1.11
SW2: MCU1.14 R7.1 SW2.1 SW2.2 | length 33.7
  Top Layer w0.3: MCU1.14 27.95,22.625 31.575,19 31.575,17.5 31.575,7.375
  Top Layer w0.4: SW2.2 31.575,7.375
  Top Layer w0.5: SW2.1 33.5,4.1 33.5,10.875 35.4,12.775 R7.1
SWD.SWCLK: J3.3 MCU1.20 | length 20.2
  Top Layer w0.3: J3.3 17.635,34.335 17.2,33.9 17.2,28.931 18.456,27.675 27.424,27.675 27.6,27.499 27.6,26.756 27.424,26.58 26.71,26.58 MCU1.20
SWD.SWDIO: J3.4 MCU1.19 | length 15.8
  Top Layer w0.3: J3.4 19.425,29.275 20.425,28.275 28.224,28.275 28.4,28.099 28.4,26.075 28.2,25.875 MCU1.19
UART.RX: J4.4 MCU1.18 | length 13.9
  Top Layer w0.3: J4.4 22.632,31.9 26.375,31.9 29.3,28.975 29.3,26.075 28.45,25.225 MCU1.18
UART.TX: J4.3 MCU1.17 | length 16.9
  Top Layer w0.3: J4.3 25.04,34.335 30.1,29.275 30.1,26.075 28.6,24.575 MCU1.17
VIN: C1.P J1.P U1.1 VD1.A VD1.C | length 28.9
  Top Layer w1: U1.1 58.6,22.975 60.698,20.877 C1.P@60.698,20.175 ; VD1.C 56,13.989 56.586,14.575 58.4,14.575 60.7,16.875 C1.P ; VD1.A@56.002,7.813 56,7.811 56,5.975 57,4.975 J1.P
pads on no net: J1.S1 J1.S2 J5.2 MCU1.2 MCU1.3 MCU1.6 SW1.GND SW2.N1 SW2.N2

## Polygon pours and split planes (outlines as drawn)
GND on Bottom Layer "GND_L02_P001" (solid, remove dead copper, pour order 1): 75,45.975 0,45.975 0,0 75,0

## Silkscreen, mask and mechanical layers (free items; w line width, h text height)
Bottom Overlay:
  lines w0.15: 0.125,36.05 5.795,36.05 5.795,38.826 0.125,38.826 0.125,36.05 ; 0.125,36.051 5.8,36.051 5.8,33.3 0.125,33.3 0.125,36.051 ; 0.3,18.6 5.8,18.6 5.8,23.1 0.3,23.1 0.3,18.6
  text "+5" at 2.875,42.225 h0.7
  text "GND" at 2.875,39.625 h0.7
  text "BOOT0" at 17.446,39.354 h1
  text "3V3" at 27.346,39.354 h1
  text "GND" at 17.446,36.554 h1
  text "GND" at 27.346,36.554 h1
  text "Hall / S1" at 3.075,36.207 h0.7
  text "SWCLK" at 17.446,33.754 h1
  text "TX" at 26.346,33.754 h1
  text "Hall / S2" at 3.075,33.453 h0.7
  text "GND" at 2.875,32.025 h0.7
  text "SWDIO" at 17.446,31.354 h1
  text "RX" at 26.346,31.354 h1
  text "+5" at 2.875,29.45 h0.7
  text "GND" at 2.875,26.7 h0.7
  text "+5" at 2.875,24.375 h0.7
  text "PWM / OUT" at 3.075,19.6 h0.7
  text "PWM_FC" at 17.346,16.821 h1
  text "+5" at 2.875,16.7 h0.7
  text "GND" at 2.875,13.875 h0.8
  text "Dr5x3 / Rev.1" at 49.85,11.421 h1
  text "GND_FC" at 10.246,11.221 h1
Board:
  the board outline again, w0.05
Bottom Assembly:
  lines w0.3: 58.775,37.85 61.775,37.85

## Dimensions
-0.05,46 to 0,0 on Dimensions
0,0 to 75,0 on Dimensions